# Altium PCB Control Board-v1.0.PcbDoc (part 7 of 8)
Units mil, origin at the board's own origin, x right, y up, seen from the top; angles counter-clockwise.
Board outline 7874.02 x 5118.11 mil, 4 copper layers (Top Layer, Layer 1, Layer 2, Bottom Layer), stack 61.654 mil thick; 475 components, 366 nets, 1579 pads, 587 vias.
Unrouted connection lines stored in the file: 427.
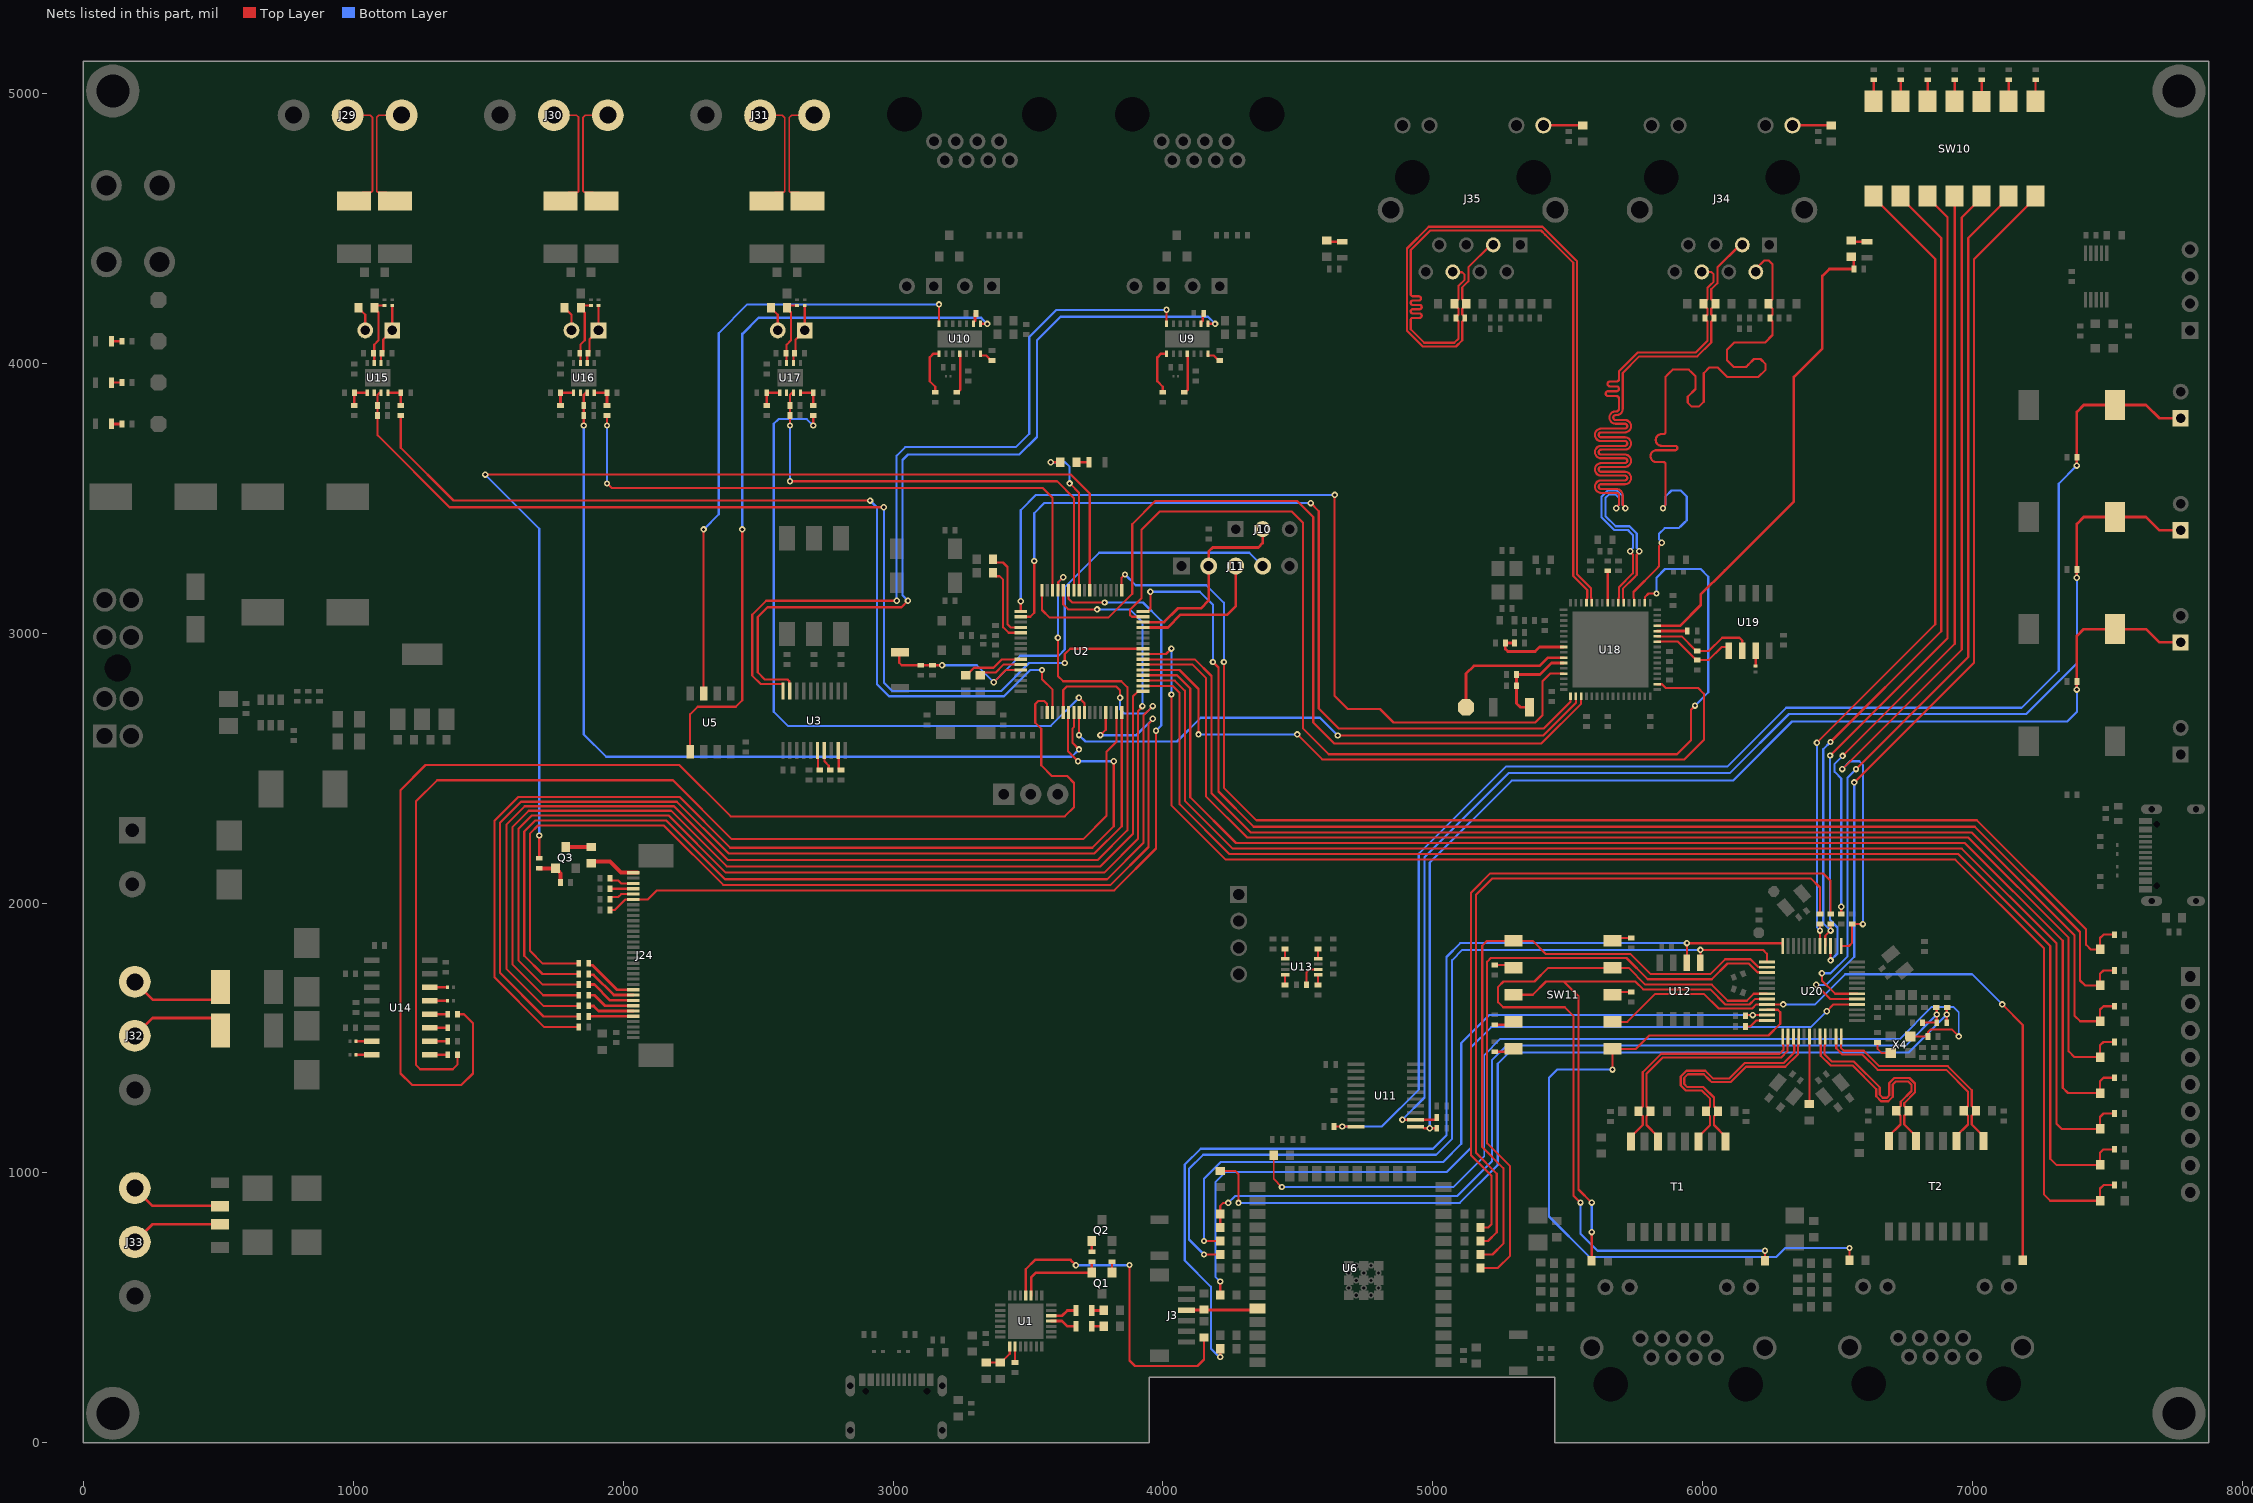
[diagram p6: the nets of this part, all layers, seen from the top]

## Via types
v1: diameter 23.62, hole 11.81, Top Layer to Bottom Layer, 587 vias

## Nets (pads, with @x,y where several pads share a name; then routed paths per layer and width w, separated by ;. In a path a pad name is that pad's centre, name@x,y a point inside that pad or via, vN(x,y) a via of type N, cw(c..) or ccw(c..) an arc to the next point about the centre after c; other vN are vias at no path point) (continued)
NetJ24_5: J24.5 R66.2 | length 165.3
  Top Layer w10: R66.2@1872.47,1579.8 1873.1,1580.43 J24.5@2037.47,1580.43
NetJ24_6: J24.6 R67.2 | length 172.9
  Top Layer w10: R67.2@1872.47,1619.17 1873.37,1618.28 1890.62,1618.28 1908.78,1600.11 J24.6@2037.47,1600.11
NetJ24_7: J24.7 R68.2 | length 181
  Top Layer w10: R68.2@1872.47,1658.54 1893.08,1658.54 1931.82,1619.8 J24.7@2037.47,1619.8
NetJ24_8: J24.8 R69.2 | length 189.2
  Top Layer w10: R69.2@1872.47,1697.91 1893.31,1697.91 1951.74,1639.48 J24.8@2037.47,1639.48
NetJ24_9: J24.9 R70.2 | length 197.4
  Top Layer w10: R70.2@1872.47,1737.28 1875.59,1734.17 1890.62,1734.17 1965.62,1659.17 J24.9@2037.47,1659.17
NetJ24_10: J24.10 R71.2 | length 207.6
  Top Layer w10: R71.2@1872.47,1776.65 1872.47,1773.15 1876.47,1769.15 1887.35,1769.15 1977.65,1678.85 J24.10@2037.47,1678.85
NetJ24_28: J24.28 R93.2 | length 96.1
  Top Layer w8: R93.2@1951.47,2013.87 1951.47,2017.37 1956.47,2022.37 1981.76,2022.37 1992.57,2033.18 J24.28@2037.47,2033.18
NetJ24_29: J24.29 R94.2 | length 86
  Top Layer w8: R94.2@1951.47,2052.87 J24.29@2037.47,2052.87
NetJ24_30: J24.30 R95.2 | length 96.1
  Top Layer w8: R95.2@1951.47,2091.87 1951.47,2088.37 1956.47,2083.37 1981.76,2083.37 1992.57,2072.55 J24.30@2037.47,2072.55
NetJ24_32: J24.32 R97.2 | length 192.2
  Top Layer w15: R97.2@1881.07,2147.55 1888.12,2154.6 1950.59,2154.6 1992.25,2112.94 J24.32@2053.07,2112.94
NetJ26_1: J26.1 R112.1 R116.2 U15.6 | length 228.4
  Top Layer w8: U15.6@1103.32,4000.65 R116.2@1103.32,4036.74 ; R116.2@1106.36,4036.74 1111.04,4041.42 1111.04,4087.96 J26.1@1144.72,4121.65 R112.1@1144.72,4213.2
NetJ26_2: J26.2 R119.2 | length 93.8
  Top Layer w8: R119.2@1019.32,4204.88 1044.72,4179.48 J26.2@1044.72,4121.65
NetJ27_1: J27.1 R136.1 R140.2 U16.6 | length 228.4
  Top Layer w8: U16.6@1867.32,4000.65 R140.2@1867.32,4036.74 ; R140.2@1870.36,4036.74 1875.04,4041.42 1875.04,4087.96 J27.1@1908.72,4121.65 R136.1@1908.72,4213.2
NetJ27_2: J27.2 R142.2 | length 93.8
  Top Layer w8: R142.2@1783.32,4204.88 1808.72,4179.48 J27.2@1808.72,4121.65
NetJ28_1: J28.1 R137.1 R141.2 U17.6 | length 228.4
  Top Layer w8: U17.6@2631.32,4000.65 R141.2@2631.32,4036.74 ; R141.2@2634.36,4036.74 2639.04,4041.42 2639.04,4087.96 J28.1@2672.72,4121.65 R137.1@2672.72,4213.2
NetJ28_2: J28.2 R143.2 | length 93.8
  Top Layer w8: R143.2@2547.32,4204.88 2572.72,4179.48 J28.2@2572.72,4121.65
NetJ34_9: J34.9 R150.2 | length 144.3
  Top Layer w10: J34.9@6331.97,4881.1 R150.2@6476.32,4881.1
NetJ35_9: J35.9 R160.2 | length 146.2
  Top Layer w10: J35.9@5409.15,4881.1 R160.2@5555.32,4881.1
NetLED1_1: LED1.1 R44.2 | length 38.9
  Top Layer w10: LED1.1@104.37,3775.02 R44.2@143.31,3775.02
NetLED2_1: LED2.1 R45.2 | length 38.9
  Top Layer w8: LED2.1@104.37,3928.02 R45.2@143.31,3928.02
NetLED3_1: LED3.1 R46.2 | length 38.9
  Top Layer w8: LED3.1@104.37,4081.02 R46.2@143.31,4081.02
NetLED4_2: LED4.2 R163.1 | length 60.2
  Top Layer w10: R163.1@6549.83,4454.17 6554.3,4449.7 LED4.2@6608.15,4449.7
NetLED5_2: LED5.2 R164.1 | length 60.2
  Top Layer w10: R164.1@4606.32,4454.17 4610.79,4449.7 LED5.2@4664.63,4449.7
NetLED6_1: LED6.1 R89.2 | length 46.6
  Top Layer w8: R89.2@3679.43,3633.11 LED6.1@3726,3633.11
NetLED7_1: LED7.1 R73.1 | length 43.9
  Top Layer w10: LED7.1@3736.54,490.74 R73.1@3780.49,490.74
NetLED7_2: LED7.2 U1.19 | length 99.7
  Top Layer w10: U1.19@3585.98,471.06 3625.87,471.06 3645.55,490.74 LED7.2@3677.49,490.74
NetLED8_1: LED8.1 R75.1 | length 43.9
  Top Layer w10: LED8.1@3736.54,431.69 R75.1@3780.49,431.69
NetLED8_2: LED8.2 U1.18 | length 99.7
  Top Layer w10: U1.18@3585.98,451.37 3625.87,451.37 3645.55,431.69 LED8.2@3677.49,431.69
NetQ1_1: Q1.1 R76.2 | length 40.4
  Top Layer w9: R76.2@3811,671.3 3811,631.44 Q1.1@3811.4,631.04
NetQ2_1: Q2.1 R77.2 | length 40
  Top Layer w9: R77.2@3736.6,708.3 Q2.1@3736.6,748.3
NetQ3_1: Q3.1 R101.2 R102.1 | length 121.9
  Top Layer w15: R101.2@1689.07,2128.81 Q3.1@1749.67,2128.81 1749.67,2126.85 1758.31,2118.2 1759.79,2118.2 1768.57,2109.42 R102.1@1768.57,2076.2
NetQ3_3: Q3.3 R97.1 | length 94
  Top Layer w15: Q3.3@1787.07,2207.55 R97.1@1881.07,2207.55
NetR8_2: R8.2 U1.9 | length 59.5
  Top Layer w8: R8.2@3452.12,297.37 U1.9@3452.12,356.88
NetR34_1: R34.1 U3.6 | length 76.5
  Top Layer w8: U3.6@2720.15,2564.7 2721.69,2563.16 2721.69,2497.68 2726.69,2492.68 R34.1@2728.44,2492.68
NetR35_1: R35.1 U3.7 | length 81.5
  Top Layer w8: U3.7@2745.74,2564.7 2745.74,2525.18 2761.92,2508.99 2761.92,2497.68 2766.92,2492.68 R35.1@2767.63,2492.68
NetR36_1: R36.1 U3.9 | length 78.1
  Top Layer w8: U3.9@2796.92,2564.7 2799.08,2562.54 2799.08,2497.68 2804.08,2492.68 R36.1@2807.22,2492.68
NetR47_2: R47.2 U9.9 | length 40.4
  Top Layer w10: U9.9@4140.98,4145.65 4140.98,4151.55 4146.81,4157.37 R47.2@4146.81,4183.65
NetR49_1: R49.1 U9.4 | length 302
  Top Layer w9: R49.1@4082.31,3892.15 R49.1@4091.19,3901.03 ; R49.1@4082.31,3892.15 R49.1@4078.81,3892.15 R49.1@4082.31,3892.15 ; R49.1@4082.31,3892.15 R49.1@4091.19,3901.03 ; R49.1@4091.19,3901.03 U9.4@4091.19,4034.02 ; R49.1@4091.19,3901.03 U9.4@4091.19,4034.02 ; U9.4@4091.19,4034.02 U9.4@4089.8,4035.41 U9.4@4091.19,4034.02
NetR50_1: R50.1 U9.1 | length 177.7
  Top Layer w9: R50.1@3999.34,3892.15 3999.34,3912.67 3979.01,3933 3979.01,4021.71 3992.71,4035.41 U9.1@4013.03,4035.41
NetR51_2: R51.2 U9.7 | length 57
  Top Layer w9: U9.7@4166.57,4035.41 4166.57,4029.87 4167.98,4028.46 4188.11,4028.46 4206.35,4010.22 R51.2@4209.85,4010.22
NetR55_2: R55.2 U10.9 | length 40.4
  Top Layer w10: U10.9@3297.91,4145.65 3297.91,4151.55 3303.73,4157.37 R55.2@3303.73,4183.65
NetR57_1: R57.1 U10.4 | length 302
  Top Layer w9: R57.1@3239.23,3892.15 R57.1@3235.73,3892.15 R57.1@3239.23,3892.15 ; R57.1@3239.23,3892.15 R57.1@3248.12,3901.03 ; R57.1@3239.23,3892.15 R57.1@3248.12,3901.03 ; R57.1@3248.12,3901.03 U10.4@3248.12,4034.02 ; R57.1@3248.12,3901.03 U10.4@3248.12,4034.02 ; U10.4@3248.12,4034.02 U10.4@3246.73,4035.41 U10.4@3248.12,4034.02
NetR58_1: R58.1 U10.1 | length 177.7
  Top Layer w9: R58.1@3156.27,3892.15 3156.27,3912.67 3135.94,3933 3135.94,4021.71 3149.64,4035.41 U10.1@3169.96,4035.41
NetR59_2: R59.2 U10.7 | length 57
  Top Layer w9: U10.7@3323.5,4035.41 3323.5,4029.87 3324.91,4028.46 3345.03,4028.46 3363.27,4010.22 R59.2@3366.77,4010.22
NetR72_2: R72.2 R74.2 U1.8 | length 126.7
  Top Layer w8: R72.2@3345.99,297.37 R74.2@3397,297.37 3399.5,297.37 3432.43,330.3 U1.8@3432.43,356.88
NetR89_1: R89.1 U2.57 | length 584.3
  Top Layer w8: v1(3584.1,3633.11) R89.1@3619.43,3633.11 ; v1(3654.1,3554.74) 3689.43,3519.4 U2.57@3689.43,3158.79
  Bottom Layer w8: v1(3584.1,3633.11) 3637,3633.11 3654.1,3616.01 v1(3654.1,3554.74)
NetR91_1: R91.1 U13.6 | length 93.8
  Top Layer w8: R91.1@4531.96,1696.86 4531.96,1744.02 4541.96,1754.02 U13.6@4574.48,1754.02
NetR96_1: R96.1 U13.5 | length 37.5
  Top Layer w8: R96.1@4574.48,1696.86 U13.5@4574.48,1734.33
NetR98_1: R98.1 U13.4 | length 37.5
  Top Layer w8: R98.1@4452.43,1696.86 U13.4@4452.43,1734.33
NetR99_2: R99.2 U13.8 | length 36.5
  Top Layer w8: U13.8@4574.48,1793.39 R99.2@4574.48,1829.86
NetR100_2: R100.2 U13.1 | length 36.5
  Top Layer w8: U13.1@4452.43,1793.39 R100.2@4452.43,1829.86
NetR103_1: R103.1 R108.2 U15.1 | length 94.7
  Top Layer w10: R108.2@1004.2,3843.65 R103.1@1004.2,3890.41 U15.1@1052.12,3890.41
NetR106_1: R106.1 R115.2 U15.4 | length 94.2
  Top Layer w10: U15.4@1128.92,3890.41 R106.1@1176.32,3890.41 R115.2@1176.32,3843.65
NetR107_1: R107.1 R110.1 R119.1 U15.7 | length 257.9
  Top Layer w8: U15.7@1077.72,4000.65 1077.72,4036.74 1077.72,4068.8 1093.98,4085.07 1093.98,4187.72 1079.32,4202.38 R119.1@1079.32,4204.88 1087.63,4213.2 R110.1@1116.72,4213.2
NetR109_1: R109.1 U14.12 | length 66.7
  Top Layer w10: U14.12@1283.27,1587.99 R109.1@1350,1587.99
NetR111_1: R111.1 U14.11 | length 66.7
  Top Layer w10: U14.11@1283.27,1537.99 R111.1@1350,1537.99
NetR113_2: R113.2 U14.7 | length 58.7
  Top Layer w10: R113.2@1010,1487.99 U14.7@1068.73,1487.99
NetR114_1: R114.1 U14.10 | length 66.7
  Top Layer w10: U14.10@1283.27,1487.99 R114.1@1350,1487.99
NetR117_2: R117.2 U14.8 | length 58.7
  Top Layer w10: R117.2@1010,1437.99 U14.8@1068.73,1437.99
NetR118_1: R118.1 U14.9 | length 66.7
  Top Layer w10: U14.9@1283.27,1437.99 R118.1@1350,1437.99
NetR120_2: R120.2 U14.13 | length 66.7
  Top Layer w10: U14.13@1283.27,1637.99 R120.2@1350,1637.99
NetR121_2: R121.2 U14.14 | length 66.7
  Top Layer w10: U14.14@1283.27,1687.99 R121.2@1350,1687.99
NetR122_1: R122.1 R132.2 U16.1 | length 94.7
  Top Layer w10: R132.2@1768.2,3843.65 R122.1@1768.2,3890.41 U16.1@1816.12,3890.41
NetR125_1: R125.1 R138.2 U16.4 | length 94.2
  Top Layer w10: U16.4@1892.92,3890.41 R125.1@1940.32,3890.41 R138.2@1940.32,3843.65
NetR126_1: R126.1 R133.2 U17.1 | length 94.7
  Top Layer w10: R133.2@2532.2,3843.65 R126.1@2532.2,3890.41 U17.1@2580.12,3890.41
NetR129_1: R129.1 R139.2 U17.4 | length 94.2
  Top Layer w10: U17.4@2656.92,3890.41 R129.1@2704.32,3890.41 R139.2@2704.32,3843.65
NetR130_1: R130.1 R134.1 R142.1 U16.7 | length 257.9
  Top Layer w8: U16.7@1841.72,4000.65 1841.72,4036.74 1841.72,4068.8 1857.98,4085.07 1857.98,4187.72 1843.32,4202.38 R142.1@1843.32,4204.88 1851.63,4213.2 R134.1@1880.72,4213.2
NetR131_1: R131.1 R135.1 R143.1 U17.7 | length 257.9
  Top Layer w8: U17.7@2605.72,4000.65 2605.72,4036.74 2605.72,4068.8 2621.98,4085.07 2621.98,4187.72 2607.32,4202.38 R143.1@2607.32,4204.88 2615.63,4213.2 R135.1@2644.72,4213.2
NetR156_2: R156.2 U18.57 | length 119
  Top Layer w10: U18.57@5647.43,3111.83 R156.2@5647.43,3230.83
NetR157_2: R157.2 U18.44 | length 111.8
  Top Layer w10: U18.44@5830.5,3007.5 R157.2@5942.3,3007.5
NetR158_2: R158.2 R159.2 U18.8 | length 282.4
  Top Layer w10: R158.2@5302.3,2963.21 R159.2@5268.3,2963.21 5268.3,2941.22 5277.56,2931.96 5378.97,2931.96 5395.45,2948.44 U18.8@5484.05,2948.44
NetR169_1: R169.1 U19.7 | length 56.7
  Top Layer w10: R169.1@6195.8,2877.83 U19.7@6195.8,2934.53
NetR193_2: R193.2 U20.48 | length 89.1
  Top Layer w8: R193.2@6157.41,1543 6176.24,1543 6198.65,1565.42 U20.48@6237.19,1565.42
NetR195_1: R195.1 U20.6 | length 251.5
  Top Layer w8: R195.1@6394.67,1254.89 U20.6@6394.67,1506.37
NetR209_2: R209.2 X4.3 | length 79.3
  Top Layer w7: R209.2@6647.04,1484 6647.04,1459.51 6662.06,1444.49 X4.3@6695.58,1444.49
NetR215_1: R215.1 SW11.10 | length 71.9
  Top Layer w8: SW11.10@5665.14,1860 SW11.10@5670.14,1865 ; SW11.10@5670.14,1870 R215.1@5735,1870
NetR216_1: R216.1 SW11.8 | length 69.9
  Top Layer w8: SW11.8@5665.14,1670 R216.1@5735,1670
NetR217_2: R217.2 SW10.1 | length 80
  Top Layer w8: SW10.1@7233,4970 R217.2@7233,5050
NetR218_2: R218.2 SW10.2 | length 80
  Top Layer w8: SW10.2@7133,4970 R218.2@7133,5050
NetR219_2: R219.2 SW10.3 | length 80
  Top Layer w8: SW10.3@7033,4970 R219.2@7033,5050
NetR220_2: R220.2 SW10.4 | length 80
  Top Layer w8: SW10.4@6933,4970 R220.2@6933,5050
NetR221_2: R221.2 SW10.5 | length 80
  Top Layer w8: SW10.5@6833,4970 R221.2@6833,5050
NetR222_2: R222.2 SW10.6 | length 80
  Top Layer w8: SW10.6@6733,4970 R222.2@6733,5050
NetR223_2: R223.2 SW10.7 | length 80
  Top Layer w8: SW10.7@6633,4970 R223.2@6633,5050
NetR224_2: R224.2 SW11.2 | length 70
  Top Layer w8: R224.2@5229,1771 SW11.2@5299,1771
NetR225_2: R225.2 SW11.4 | length 70
  Top Layer w8: R225.2@5229,1549 SW11.4@5299,1549
NetR226_2: R226.2 SW11.5 | length 70
  Top Layer w8: R226.2@5229,1449 SW11.5@5299,1449
NetTP5_1: TP5.1 U18.10 | length 510.4
  Top Layer w10: TP5.1@5122.8,2725.33 5122.8,2850.09 5151.54,2878.82 5395.42,2878.82 5425.67,2909.07 U18.10@5484.05,2909.07
nFAULT_CAN: U3.19 U9.8 | length 3108.9
  Top Layer w8: U3.19@2617.79,2785.18 2615.49,2787.48 2615.49,2821.54 2608.95,2828.07 2525.23,2828.07 2498.6,2854.7 2498.6,3059.75 2534.87,3096.02 3030.98,3096.02 v1(3055,3120.04)
  Top Layer w9: U9.8@4166.57,4145.65 v1(4193.04,4145.65)
  Bottom Layer w8: v1(3055,3120.04) 3035,3140.04 3035,3641.42 3055.03,3661.44 3467.91,3661.44 3533.32,3726.85 3533.32,4084.97 3620.22,4171.87 4166.81,4171.87 v1(4193.04,4145.65)
nFAULT_CAN_2: U5.5 U10.8 | length 2678.4
  Top Layer w8: U5.5@2248.08,2560.18 2248.08,2699.19 2276,2727.11 2417.56,2727.11 2441.58,2751.13 v1(2441.58,3384.11)
  Top Layer w9: U10.8@3323.5,4145.65 v1(3348.96,4145.65)
  Bottom Layer w9: v1(2441.58,3384.11) 2441.58,4035.69 2441.58,4108.28 2501.81,4168.52 3326.09,4168.52 v1(3348.96,4145.65)
NRST: C13.2 J11.4 R20.1 SW6.2 U2.12 | length 1888.6
  Top Layer w8: SW6.2@3022.96,2929.27 3022.96,2889.84 3031.96,2880.84 R20.1@3145.96,2880.84 v1(3181.71,2880.84) ; v1(3372.84,2818.31) 3418.05,2863.52 U2.12@3472.9,2863.52
  Bottom Layer w8: v1(3181.71,2880.84) 3310.31,2880.84 v1(3372.84,2818.31) 3470.7,2916.16 3613.33,2916.16 3636.28,2939.11 3636.28,3170.39 3763.61,3297.72 4319.98,3297.72 J11.4@4369.27,3248.42
nSTB_CAN: U3.20 U9.14 | length 2956.7
  Top Layer w8: U3.20@2592.19,2785.18 2592.19,2809.65 2589.9,2811.95 2508.88,2811.95 2478.33,2842.5 2478.33,3068.15 2530.23,3120.04 v1(3013.37,3120.04) ; U9.14@4013.03,4145.65 v1(4013.03,4197.65)
  Bottom Layer w8: v1(3013.37,3120.04) 3013.37,3657.48 3045,3689.11 3455,3689.11 3504.62,3738.73 3504.62,4096.85 3605.42,4197.65 v1(4013.03,4197.65)
nSTB_CAN_2: U5.3 U10.14 | length 2290.2
  Top Layer w8: U5.3@2298.08,2776.72 v1(2298.08,3384.11) ; U10.14@3169.96,4145.65 v1(3169.96,4217.86)
  Bottom Layer w8: v1(2298.08,3384.11) 2353.98,3440.01 2353.98,4111.5 2460.33,4217.86 v1(3169.96,4217.86)
OSC_EN: R172.1 R213.2 X4.1 | length 3439.8
  Top Layer w7: R172.1@4410.5,1065 4410.5,977.9 v1(4440.5,947.9) ; X4.1@6768.41,1505.51 R213.2@6833.6,1505.51 6833.96,1505.87 6833.96,1521 6844.69,1531.74 6922.26,1531.74 v1(6948,1506)
  Bottom Layer w7: v1(4440.5,947.9) 5075.25,947.9 5190.09,1062.73 5190.09,1436.83 5250.24,1496.98 6730.72,1496.98 6848.74,1615 6928,1615 6948,1595 v1(6948,1506)
P1LED0: R177.2 SW11.3 U20.44 | length 2079.5
  Top Layer w8: SW11.3@5299,1660 5369.91,1660 5419.2,1709.29 5484.56,1709.29 ; R177.2@5588.21,674.96 v1(5588.21,781) ; v1(5588.21,890.08) 5539.47,938.82 5539.47,1654.38 5484.56,1709.29 ; U20.44@6237.19,1644.16 6237.03,1644 6192.64,1644 6172.75,1624.11 6083.47,1624.11 6027.29,1680.3 5779.08,1680.3 5750.09,1709.29 5484.56,1709.29
  Bottom Layer w8: v1(5588.21,781) v1(5588.21,890.08)
P1LED1: R181.2 SW11.9 U20.43 | length 3009.7
  Top Layer w8: v1(5546.64,890.08) 5520.35,916.38 5520.35,1582.34 5488.69,1614 5260,1614 5241.5,1632.5 5241.5,1689.5 5261.29,1709.29 5376.29,1709.29 5427,1760 SW11.9@5665.14,1760 5725.03,1760 5787.13,1697.9 6032.92,1697.9 6092.54,1638.28 6163.17,1638.28 6188.74,1663.85 U20.43@6237.18,1663.85 ; R181.2@6230.37,674.96 v1(6230.37,712) 6230.37,713.37 v1@6231,714
  Bottom Layer w8: v1(5546.64,890.08) 5546.64,775.36 5610,712 v1(6230.37,712)
P2LED0: R192.2 SW11.6 U20.46 | length 2829.8
  Top Layer w8: SW11.6@5665.14,1460 SW11.6@5665.47,1459.67 ; v1(5665.47,1382.97) SW11.6@5665.47,1459.67 ; U20.46@6237.19,1604.79 6277.32,1604.79 6286.67,1595.43 6286.67,1552.87 6242.92,1509.12 5801.95,1509.12 5752.51,1459.67 SW11.6@5665.47,1459.67 ; R192.2@6543.16,677 v1(6543.16,722.13)
  Bottom Layer w8: v1(5665.47,1382.97) 5459.97,1382.97 5429.93,1352.93 5429.93,838.83 5580.57,688.19 6271.19,688.19 6305.13,722.13 v1(6543.16,722.13)
P2LED1: R198.2 SW11.7 U20.45 | length 2587.4
  Top Layer w8: SW11.7@5665.14,1560 5665.47,1559.67 5719.7,1559.67 5823.69,1663.66 6003.94,1663.66 6058.49,1609.12 6182.91,1609.12 6198.27,1624.48 U20.45@6237.18,1624.48 v1(6297.55,1624.48) ; v1(7109,1624.48) 7185.16,1548.32 R198.2@7185.16,677
  Bottom Layer w8: v1(6297.55,1624.48) 6415.85,1624.48 6527.37,1736 6997.48,1736 v1(7109,1624.48)
PA8: D10.1 R28.1 U2.36 | length 4844.6
  Top Layer w8: U2.36@3925.65,2843.84 4052,2843.84 4100.8,2795.04 4100.8,2391.9 4270.25,2222.45 6970.75,2222.45 7333.05,1860.16 7333.05,1315.71 7352.67,1296.09 D10.1@7471.63,1296.09 ; D10.1@7471.63,1296.52 7471.63,1340.21 7484.13,1352.71 R28.1@7525.18,1352.71
PAUSE: C30.2 J5.1 R7.1 SW4.1 U11.12 | length 4789.7
  Top Layer w8: v1(4886.79,1197.33) U11.12@4935.47,1197.33 5013,1197.33 5018,1202.33 R7.1@5018,1205.77
  Top Layer w10: v1(7385.5,3205.45) C30.2@7385.5,3236.11 7385.5,3404.38 7411.22,3430.09 SW4.1@7526.45,3430.09 7641.79,3430.09 7691,3380.88 J5.1@7770.22,3380.88
  Bottom Layer w8: v1(4886.79,1197.33) 4968.99,1279.53 4968.99,2169.99 5280.24,2481.24 6100.11,2481.24 6319.43,2700.55 7198.38,2700.55 7385.5,2887.68 v1(7385.5,3205.45)
PB14: D8.1 R30.1 U2.34 | length 5086.6
  Top Layer w8: U2.34@3925.65,2804.47 4035.48,2804.47 4061.59,2778.36 4061.59,2365.96 4245.82,2181.73 6946.32,2181.73 7286.98,1841.08 7286.98,1052.95 7309.83,1030.09 D8.1@7471.63,1030.09 ; D8.1@7471.63,1031.38 7471.63,1075.07 7484.13,1087.57 R30.1@7525.18,1087.57
PB15: D9.1 R29.1 U2.35 | length 4984.3
  Top Layer w8: U2.35@3925.65,2824.15 4043.76,2824.15 4081.05,2786.86 4081.05,2379.13 4258.57,2201.61 6959.07,2201.61 7310.05,1850.63 7310.05,1182.18 7329.13,1163.09 D9.1@7471.63,1163.09 D9.1@7471.63,1164.8 ; D9.1@7459.88,1176.55 D9.1@7471.63,1164.8 ; R29.1@7525.18,1220.14 7484.13,1220.14 7471.63,1207.64 D9.1@7471.63,1164.8
PC6: D11.1 R27.1 U2.38 | length 4753.7
  Top Layer w8: U2.38@3925.65,2883.21 4109.92,2883.21 4158.94,2834.19 4158.94,2395.68 4311.81,2242.8 6983.56,2242.8 7354.97,1871.39 7354.97,1451.24 7377.12,1429.09 D11.1@7471.63,1429.09 7471.63,1472.78 7484.13,1485.28 R27.1@7525.18,1485.28
PC7: D12.1 R26.1 U2.39 | length 4632.6
  Top Layer w8: U2.39@3925.65,2902.89 4118.1,2902.89 4179.61,2841.38 4179.61,2406.84 4324.97,2261.48 6996.76,2261.48 7377.06,1881.18 7377.06,1582.94 7397.91,1562.09 D12.1@7471.63,1562.09 7471.63,1605.35 7484.13,1617.85 R26.1@7525.18,1617.85
PC8: D13.1 R24.1 U2.48 | length 4817.7
  Top Layer w8: U2.48@3925.65,3080.06 3927.55,3081.96 3945.85,3081.96 3953.3,3089.41 v1(3953.3,3153.27) ; v1(4185,2893.2) 4205.43,2872.78 4205.43,2413.37 4336.03,2282.76 7007.6,2282.76 7397.49,1892.88 7397.49,1713.14 7415.54,1695.09 D13.1@7471.63,1695.09 7471.63,1737.93 7484.13,1750.43 R24.1@7525.18,1750.43
  Bottom Layer w8: v1(3953.3,3153.27) 4136.62,3153.27 4185,3104.89 v1(4185,2893.2)
PC9: D14.1 R23.1 U2.49 | length 4787
  Top Layer w8: U2.49@3846.91,3158.79 3846.91,3204.84 3859.14,3217.06 v1(3859.14,3217.34) ; v1(4225.52,2893.2) 4225.52,2427.21 4345.97,2306.76 7014.84,2306.76 7419.86,1901.75 7419.86,1845.61 7437.38,1828.09 D14.1@7471.63,1828.09 7471.63,1870.5 7484.13,1883 R23.1@7525.18,1883
  Bottom Layer w8: v1(3859.14,3217.34) 3899.19,3177.29 4160.74,3177.29 4225.52,3112.51 v1(4225.52,2893.2)
PC14-OSC32_IN: R13.2 U2.4 | length 332.6
  Top Layer w8: R13.2@3370.27,3274.42 3370.27,3272.94 3381.27,3261.94 3407.54,3261.94 3424.27,3245.21 3424.27,3033.25 3436.53,3021 U2.4@3472.9,3021
PC15-OSC32_OUT: R14.2 U2.5 | length 298.5
  Top Layer w8: R14.2@3370.27,3223.42 3370.27,3221.55 3381.27,3210.55 3394.73,3210.55 3407.91,3197.36 3407.91,3021.9 3428.49,3001.32 U2.5@3472.9,3001.32
PD8: D7.1 R31.1 U2.40 | length 5378.1
  Top Layer w8: U2.40@3925.65,2922.58 4011.06,2922.58 v1(4031.06,2942.58) ; v1(4031.06,2772.42) 4031.06,2362.17 4232.25,2160.98 6935.13,2160.98 7264.39,1831.72 7264.39,919.87 7287.17,897.09 D7.1@7471.63,897.09 ; D7.1@7471.63,898.8 7471.63,942.5 7484.13,955 R31.1@7525.18,955
  Bottom Layer w8: v1(4031.06,2772.42) v1(4031.06,2942.58)
PF0-OSC_IN: R18.2 U2.10 | length 227.9
  Top Layer w8: R18.2@3269.46,2843.84 3271.96,2843.84 3299.56,2871.44 3371.99,2871.44 3403.44,2902.89 U2.10@3472.9,2902.89
PF1-OSC_OUT: R19.2 U2.11 | length 166.7
  Top Layer w8: R19.2@3322.46,2843.84 3332.99,2854.36 3379.95,2854.36 3408.8,2883.21 U2.11@3472.9,2883.21
RE/DE/RS485/T: R104.1 R105.1 U2.41 U15.2 U15.3 | length 3859
  Top Layer w8: U15.3@1103.32,3890.41 1097.63,3890.41 1090.32,3883.09 R104.1@1090.32,3843.65 R105.1@1090.32,3806.57 1090.32,3733.07 1357.03,3466.37 v1(2965.82,3466.37) ; v1(3636.28,2889.11) 3636.28,2922.58 3655.96,2942.26 U2.41@3925.65,2942.26
  Bottom Layer w8: v1(2965.82,3466.37) 2965.82,2817.32 2998.04,2785.09 3399.72,2785.09 3503.74,2889.11 v1(3636.28,2889.11)
RE/DE/RS485/T-2: R123.1 R124.1 U2.23 U16.2 U16.3 | length 3303.5
  Top Layer w8: v1(1854.32,3769.11) R124.1@1854.32,3806.57 R123.1@1854.32,3843.65 1854.32,3883.09 1861.63,3890.41 U16.3@1867.32,3890.41 ; U2.23@3669.74,2706.04 3669.74,2651.6 3665.21,2647.07 3665.21,2592.92 v1(3689.02,2569.11)
  Bottom Layer w8: v1(1854.32,3769.11) 1854.32,2624.67 1937.28,2541.71 3661.62,2541.71 v1(3689.02,2569.11)
RE/DE/RS485/T-3: R127.1 R128.1 U2.58 U17.2 U17.3 | length 1755.5
  Top Layer w8: v1(2618.32,3562.34) 3607.79,3562.34 3669.74,3500.39 U2.58@3669.74,3158.79 ; v1(2618.32,3769.11) R128.1@2618.32,3806.57 R127.1@2618.32,3843.65 2618.32,3883.09 2625.63,3890.41 U17.3@2631.32,3890.41
  Bottom Layer w8: v1(2618.32,3562.34) v1(2618.32,3769.11)
REF_CLK_50M_I: R78.1 R229.1 R230.2 | length 3369.2
  Top Layer w8: R78.1@4212,1007.9 4267.43,1007.9 4279.73,995.59 v1(4279.73,889.21) ; R229.1@6903.74,1557 v1(6903.74,1587.14) 6903.74,1611.28 R230.2@6905.74,1613.28
  Bottom Layer w8: v1(4279.73,889.21) 5099.94,889.21 5240.3,1029.57 5240.3,1404.84 5282.32,1446.86 6763.46,1446.86 v1(6903.74,1587.14)
REF_CLK_50M_O: R79.1 R80.1 R227.2 R228.2 R229.2 | length 3361.6
  Top Layer w8: R79.1@4212,798 R80.1@4212,848 4212,878.06 4223.15,889.21 v1(4241.71,889.21) v1@4244.71,889.21 ; R227.2@6813.63,1557 R229.2@6866.74,1557 v1(6866.74,1587.14) 6866.74,1611.28 R228.2@6864.74,1613.28
  Bottom Layer w8: v1(4241.71,889.21) 4267.34,914.84 5090.57,914.84 5218.3,1042.57 5218.3,1417.84 5272.32,1471.86 6751.46,1471.86 v1(6866.74,1587.14)
RS232_RX: F3.1 J32.1 | length 343.1
  Top Layer w10: J32.1@191,1708.11 257,1642.11 505.73,1642.11 F3.1@506.43,1641.41
RS232_RX-2: F6.1 J33.1 | length 343.1
  Top Layer w10: J33.1@191,944.11 257,878.11 505.73,878.11 F6.1@506.43,877.41
RS232_TX: F4.1 J32.2 | length 343
  Top Layer w10: J32.2@191,1508.11 257,1574.11 505.81,1574.11 F4.1@506.43,1574.73
RS232_TX-2: F5.1 J33.2 | length 343
  Top Layer w10: J33.2@191,744.11 257,810.11 505.81,810.11 F5.1@506.43,810.73
RS485-2_N: F7.2 J30.2 | length 451
  Top Layer w6.5: J30.2@1743.32,4918.65 1827.22,4918.65 1835.07,4910.79 1835.07,4637.24 1831.26,4633.43 1799.11,4633.43 F7.2@1767.32,4601.65
RS485-2_P: F9.2 J30.1 | length 451.2
  Top Layer w6.5: F9.2@1919.32,4601.65 1887.53,4633.43 1855.38,4633.43 1851.57,4637.24 1851.57,4911.04 1859.17,4918.65 J30.1@1943.32,4918.65
RS485-3_N: F8.2 J31.2 | length 450.3
  Top Layer w6.5: J31.2@2507.32,4918.65 2589.91,4918.65 2599.07,4909.49 2599.07,4637.24 2595.26,4633.43 2563.11,4633.43 F8.2@2531.32,4601.65
RS485-3_P: F10.2 J31.1 | length 450.6
  Top Layer w6.5: F10.2@2683.32,4601.65 2651.53,4633.43 2619.38,4633.43 2615.57,4637.24 2615.57,4910.04 2624.17,4918.65 J31.1@2707.32,4918.65
RS485_N: F1.2 J29.2 | length 451
  Top Layer w6.5: J29.2@979.32,4918.65 1063.22,4918.65 1071.07,4910.79 1071.07,4637.24 1067.26,4633.43 1035.11,4633.43 F1.2@1003.32,4601.65
RS485_P: F2.2 J29.1 | length 451.2
  Top Layer w6.5: F2.2@1155.32,4601.65 1123.53,4633.43 1091.38,4633.43 1087.57,4637.24 1087.57,4911.04 1095.17,4918.65 J29.1@1179.32,4918.65
RST#: C59.2 R144.2 SW8.2 U18.11 | length 353.5
  Top Layer w10: SW8.2@5357.73,2725.33 5323.83,2725.33 5309.3,2739.86 C59.2@5309.3,2805.33 R144.2@5309.3,2846.33 5396.11,2846.33 5439.17,2889.39 U18.11@5484.05,2889.39
RSTN: R171.1 R191.2 U20.47 | length 2874.7
  Top Layer w8: v1(4152,748) R171.1@4212,748 ; R191.2@6157.41,1582.11 6160.41,1585.11 U20.47@6237.18,1585.11
  Bottom Layer w8: v1(4152,748) 4152,978.72 4214.03,1040.74 5037.74,1040.74 5105,1108 5105,1481.65 5208.35,1585 v1(6185,1585)
RTS: Q1.2 R77.1 U1.24 | length 339.8
  Top Layer w9: U1.24@3511.17,545.86 3511.17,612.17 3530.04,631.04 Q1.2@3736.6,631.04 R77.1@3736.6,671.3
RUNLED: R163.2 R165.1 U18.45 | length 1776
  Top Layer w10: U18.45@5830.5,3027.18 5915.72,3027.18 5991.8,3103.26 5991.8,3142.88 6081.51,3232.59 6081.69,3232.59 6337.12,3488.03 6337.12,3949.02 6442.67,4054.56 6442.67,4322.93 6468.6,4348.86 R165.1@6559.33,4348.86 6559.33,4384.67 R163.2@6549.83,4394.17
RX1_N: R186.2 T1.8 U20.1 | length 894.5
  Top Layer w8: T1.8@5734.08,1116.83 5734.08,1134.74 5777.08,1177.74 5777.08,1210.04 5761.56,1225.55 R186.2@5761.56,1228.05 5761.56,1230.55 5777.08,1246.07 5777.08,1372.88 5845.88,1441.68 6284.48,1441.68 6299.08,1456.28 6299.08,1471.4 6297.55,1472.93 6297.55,1505.05 U20.1@6296.23,1506.37
RX1_P: R185.2 T1.6 U20.2 | length 894.5
  Top Layer w8: T1.6@5834.08,1116.83 5834.08,1134.74 5791.08,1177.74 5791.08,1210.04 5806.6,1225.55 R185.2@5806.6,1228.05 5806.6,1230.55 5791.08,1246.07 5791.08,1367.08 5851.68,1427.68 6290.28,1427.68 6313.08,1450.48 6313.08,1471.4 6314.61,1472.93 6314.61,1505.05 U20.2@6315.93,1506.37
RX2_N: R203.2 T2.8 U20.8 | length 812.1
  Top Layer w8: U20.8@6434.04,1506.37 6435.35,1505.05 6435.35,1472.91 6436.87,1471.39 6436.87,1434.52 6472.87,1398.52 6554.12,1398.52 6642.35,1310.29 6642.35,1283.74 6660.21,1265.87 6687.34,1265.87 6703.58,1282.11 6703.58,1327.7 6714.93,1339.06 6760.39,1339.06 6773.19,1326.26 6773.19,1303.86 6733.16,1263.83 6733.16,1249.11 6716.64,1232.59 R203.2@6716.64,1230.09 6716.64,1227.59 6732.16,1212.08 6732.16,1179.78 6689.16,1136.78 T2.8@6689.16,1118.87
RX2_P: R202.2 T2.6 U20.9 | length 810.6
  Top Layer w8: U20.9@6453.71,1506.37 6452.4,1505.05 6452.4,1472.91 6450.87,1471.39 6450.87,1440.32 6478.67,1412.52 6559.92,1412.52 6655.35,1317.09 6655.35,1290.3 6666.77,1278.87 6681.96,1278.87 6690.58,1287.49 6690.58,1333.09 6709.55,1352.06 6765.77,1352.06 6786.19,1331.65 6786.19,1298.47 6746.16,1258.45 6746.16,1248.11 6761.68,1232.59 6761.68,1227.59 6746.16,1212.08 6746.16,1179.78 6789.16,1136.78 T2.6@6789.16,1118.87
RXA_N: C65.2 J34.6 R145.1 U18.54 | length 2854.4
  Top Layer w8: v1(5679.37,3462.65) 5679.37,3465.35 5689.17,3475.14 5689.17,3499.65 5689.17,3510.65 ccw(c5680.17,3510.65) 5680.17,3519.65 5622.98,3519.65 cw(c5622.98,3542.65) 5622.98,3565.65 5710.93,3565.65 ccw(c5710.93,3574.65) 5710.93,3583.65 5622.98,3583.65 cw(c5622.98,3606.65) 5622.98,3629.65 5710.93,3629.65 ccw(c5710.93,3638.65) 5710.93,3647.65 5622.98,3647.65 cw(c5622.98,3670.65) 5622.98,3693.65 5710.93,3693.65 ccw(c5710.93,3702.65) 5710.93,3711.65 5622.98,3711.65 cw(c5622.98,3734.65) 5622.98,3757.65 5710.93,3757.65 ccw(c5710.93,3766.65) 5710.93,3775.65 5677,3775.65 cw(c5677,3798.65) 5677,3821.65 5680.17,3821.65 ccw(c5680.17,3830.65) 5689.17,3830.65 5689.17,3859.54 5689.17,3865.11 5689.17,3869.11 ccw(c5680.17,3869.11) 5680.17,3878.11 5649.09,3878.11 cw(c5649.09,3887.11) 5649.09,3896.11 5680.17,3896.11 ccw(c5680.17,3905.11) 5680.17,3914.11 5656.06,3914.11 cw(c5656.06,3923.11) 5656.06,3932.11 5680.17,3932.11 ccw(c5680.17,3941.11) 5689.17,3941.11 5689.17,3969.35 5691.39,3971.57 5759.2,4039.38 5767.46,4039.38 5785.52,4039.38 5970.67,4039.4 5974.08,4039.4 6017.33,4082.66 6017.33,4154.63 6007.82,4164.15 C65.2@6007.82,4167.65 6007.82,4171.15 6017.33,4180.66 6017.33,4202.13 6002.32,4217.15 R145.1@6002.32,4219.65 6002.32,4222.15 6017.33,4237.16 6017.33,4279.66 6025.53,4287.86 6039.84,4302.16 6039.84,4329.4 6031.18,4338.06 5996.47,4338.06 J34.6@5996.34,4338.19 ; U18.54@5706.49,3111.83 5705.56,3112.75 5705.56,3128.74 5703.64,3130.66 5703.64,3164.46 5746.7,3207.52 5754.9,3215.72 5754.9,3290.96 5764.71,3300.77 v1(5764.71,3303.46)
  Bottom Layer w8: v1(5679.37,3462.65) 5679.37,3465.33 5689.19,3475.14 5689.19,3500.93 5675.7,3514.41 5653.07,3514.41 5639,3500.35 5639,3433.93 5677.04,3395.9 5728.21,3395.9 5740,3384.11 5754.9,3369.21 5754.9,3315.96 5764.71,3306.14 v1(5764.71,3303.46)
RXA_P: C66.2 J34.3 R146.1 U18.55 | length 2854.4
  Top Layer w8: U18.55@5686.8,3111.83 5687.72,3112.75 5687.72,3128.74 5689.64,3130.66 5689.64,3170.26 5740.9,3221.52 5740.9,3290.96 5731.09,3300.77 v1(5731.09,3303.46) ; v1(5713,3462.65) 5713,3465.32 5703.17,3475.14 5703.17,3499.65 5703.17,3510.65 ccw(c5680.17,3510.65) 5680.17,3533.65 5622.98,3533.65 cw(c5622.98,3542.65) 5622.98,3551.65 5710.93,3551.65 ccw(c5710.93,3574.65) 5710.93,3597.65 5622.98,3597.65 cw(c5622.98,3606.65) 5622.98,3615.65 5710.93,3615.65 ccw(c5710.93,3638.65) 5710.93,3661.65 5622.98,3661.65 cw(c5622.98,3670.65) 5622.98,3679.65 5710.93,3679.65 ccw(c5710.93,3702.65) 5710.93,3725.65 5622.98,3725.65 cw(c5622.98,3734.65) 5622.98,3743.65 5710.93,3743.65 ccw(c5710.93,3766.65) 5710.93,3789.65 5677,3789.65 cw(c5677,3798.65) 5677,3807.65 5680.17,3807.65 ccw(c5680.17,3830.65) 5703.17,3830.65 5703.17,3859.54 5703.17,3963.55 5765,4025.38 5979.85,4025.38 6031.33,4076.86 6031.33,4154.63 6040.84,4164.15 C66.2@6040.84,4167.65 6040.84,4171.15 6031.33,4180.66 6031.33,4202.13 6046.34,4217.15 R146.1@6046.34,4219.65 6046.34,4222.15 6031.33,4237.16 6031.33,4273.86 6053.84,4296.36 6053.84,4354.4 6137.62,4438.19 J34.3@6146.34,4438.19
  Bottom Layer w8: v1(5713,3462.65) 5713,3465.33 5703.19,3475.14 5703.19,3506.73 5681.5,3528.41 5647.27,3528.41 5625,3506.15 5625,3428.14 5671.24,3381.9 5722.42,3381.9 5730.1,3374.21 5740.9,3363.41 5740.9,3315.96 5731.09,3306.14 v1(5731.09,3303.46)
RXB_N: C91.2 J35.6 R151.1 U18.61 | length 2975
  Top Layer w8: J35.6@5073.52,4338.19 5074.51,4337.2 5108.35,4337.2 5117.45,4328.1 5117.45,4309.53 5102.71,4294.79 5094.5,4286.59 5094.5,4237.16 5079.49,4222.15 R151.1@5079.49,4219.65 5079.49,4217.15 5094.5,4202.13 5094.5,4180.66 5084.99,4171.15 C91.2@5084.99,4167.65 5084.99,4164.15 5094.5,4154.63 5094.5,4090.76 5079.49,4075.75 4967.92,4075.75 4917.7,4125.96 4917.7,4140.03 4917.7,4160.03 cw(c4925.7,4160.03) 4925.7,4168.03 4950.48,4168.03 ccw(c4950.48,4176.03) 4950.48,4184.03 4925.7,4184.03 cw(c4925.7,4192.03) 4925.7,4200.03 4950.48,4200.03 ccw(c4950.48,4208.03) 4950.48,4216.03 4925.7,4216.03 cw(c4925.7,4224.03) 4925.7,4232.03 4947.74,4232.03 ccw(c4947.74,4240.03) 4947.74,4248.03 4925.7,4248.03 cw(c4925.7,4256.03) 4917.7,4256.03 4917.7,4295.91 4917.7,4419.3 4990.05,4491.65 5400.37,4491.65 5416.37,4475.65 5520.17,4371.85 5520.17,3211.38 5571.53,3160.02 5571.53,3130.66 5569.61,3128.74 5569.61,3112.75 U18.61@5568.69,3111.83
RXB_P: C92.2 J35.3 R152.1 U18.60 | length 2975
  Top Layer w8: J35.3@5223.52,4438.19 5214.8,4438.19 5131.45,4354.84 5131.45,4303.73 5108.5,4280.79 5108.5,4237.16 5123.52,4222.15 R152.1@5123.52,4219.65 5123.52,4217.15 5108.5,4202.13 5108.5,4180.66 5118.02,4171.15 C92.2@5118.02,4167.65 5118.02,4164.15 5108.5,4154.63 5108.5,4084.96 5085.29,4061.75 4962.12,4061.75 4903.7,4120.16 4903.7,4425.1 4984.25,4505.65 5406.17,4505.65 5530.07,4381.75 5534.17,4377.65 5534.17,3217.18 5585.53,3165.82 5585.53,3130.66 5587.45,3128.74 5587.45,3112.75 U18.60@5588.38,3111.83
RXD0: J3.4 R175.2 U6.34 | length 266
  Top Layer w10: J3.4@4086.23,492.01 4343.79,492.01 U6.34@4349.78,498
RXD/RS232: R118.2 U2.31 | length 4295.7
  Top Layer w8: R118.2@1387,1437.99 1387,1402.91 1368.5,1384.41 1248.11,1384.41 1232,1400.52 1232,2376.29 1310.88,2455.16 2184.6,2455.16 2402.82,2236.94 3704.59,2236.94 3790.85,2323.2 3790.85,2560.18 3827.22,2596.55 U2.31@3827.22,2706.04
RXD/RS232-2: R109.2 U2.18 | length 4797.2
  Top Layer w8: R109.2@1387,1587.99 1410.25,1587.99 1443.78,1554.46 1443.78,1368.78 1401.28,1326.27 1217.5,1326.27 1175,1368.77 1175,2418.41 1267.99,2511.41 2207.73,2511.41 2398.1,2321.04 3636.23,2321.04 3670.34,2355.15 3670.34,2444.99 3644.85,2470.48 3588.23,2470.48 3548.73,2509.99 3548.73,2645.61 3526.75,2667.59 3526.75,2737.43 3538.06,2748.74 3560.21,2748.74 3570.42,2738.54 3570.42,2706.95 U2.18@3571.32,2706.04
RXD/RS485: R115.1 U2.19 | length 3474.5
  Top Layer w8: R115.1@1176.32,3806.65 1176.32,3686.37 1371.69,3491 v1(2914.82,3491) ; v1(3551.63,2863.52) 3551.63,2829.02 3591,2789.65 U2.19@3591,2706.04
  Bottom Layer w8: v1(2914.82,3491) 2940.21,3465.61 2940.21,2810.84 2985,2766.05 3410.89,2766.05 3508.36,2863.52 v1(3551.63,2863.52)
RXD/RS485-2: R138.1 U2.62 | length 2267.2
  Top Layer w8: v1(1940.32,3554.11) 1940.76,3554.11 1957.38,3537.49 3554.06,3537.49 3591,3500.55 U2.62@3591,3158.79 ; v1(1940.32,3769.18) R138.1@1940.32,3806.65
  Bottom Layer w8: v1(1940.32,3554.11) v1(1940.32,3769.18)
RXD/RS485-3: R139.1 U2.25 | length 2526.1
  Top Layer w8: v1(2704.32,3769.18) R139.1@2704.32,3806.65 ; v1(3688.58,2760.4) 3709.11,2739.86 U2.25@3709.11,2706.04
  Bottom Layer w8: v1(2704.32,3769.18) 2680.58,3792.92 2575.3,3792.92 2557.91,3775.52 2557.91,2708.79 2610.42,2656.28 3584.47,2656.28 v1(3688.58,2760.4)
RXD_0: R84.1 R210.1 | length 2767.5
  Top Layer w8: R84.1@5176.54,748 5204.3,748 5236.69,780.39 5236.69,997.58 5159.77,1074.49 5159.77,2030.71 5220.59,2091.53 6399.82,2091.53 6434.04,2057.31 R210.1@6434.04,1959.18
RXD_1: R85.1 R211.1 | length 2801
  Top Layer w8: R85.1@5176.54,798 5204.46,798 5217.09,810.63 5217.09,989.81 5141.25,1065.66 5141.25,2038.39 5212.92,2110.05 6444.95,2110.05 6473.41,2081.59 R211.1@6473.41,1959.18
RXD_CP2102: R174.1 U1.25 | length 1234.3
  Top Layer w9: U1.25@3491.49,545.86 3491.49,643.38 3526.23,678.12 3657.67,678.12 v1(3677.49,658.3) ; v1(3876,659) 3876,305.87 3896.87,285 4128.06,285 4152,308.94 R174.1@4152,390.64
  Bottom Layer w9: v1(3677.49,658.3) 3677.84,658.65 3875.65,658.65 v1(3876,659)
SCL: R162.1 U18.43 U19.6 | length 400.6
  Top Layer w8: U18.43@5830.5,2987.81 5921.43,2987.81 5970.74,2938.5 5974.3,2938.5 R162.1@5979.3,2933.5 6022.13,2933.5 6071.36,2982.73 6135.86,2982.73 6145.8,2972.79 U19.6@6145.8,2934.53
SCL_MDC: R88.1 U12.6 U20.36 | length 3822.9
  Top Layer w8: v1(4212,318.17) R88.1@4212,348 ; U12.6@5941.04,1779.3 v1(5941.04,1851.5) 5941.54,1850.99 6294.92,1850.99 6296.23,1849.68 U20.36@6296.23,1841
  Bottom Layer w8: v1(4212,318.17) 4208.83,318.17 4177.33,349.67 4177.33,578.97 4080.82,675.47 4080.82,1031.1 4139.36,1089.64 5000.35,1089.64 5050.13,1139.42 5050.13,1800.19 5101.44,1851.5 v1(5941.04,1851.5)
SDA: R161.1 U18.42 U19.5 | length 326.5
  Top Layer w8: U18.42@5830.5,2968.13 5831.32,2968.95 5906.75,2968.95 5969.73,2905.97 5974.3,2905.97 R161.1@5979.3,2900.97 ; R161.1@5975.8,2900.97 6022.32,2900.97 6070.12,2948.76 6087.6,2948.76 6095.8,2940.56 U19.5@6095.8,2934.53
SDA_MDIO: R87.1 U12.5 U20.37 | length 3348
  Top Layer w8: v1(4152,698) R87.1@4212,698 ; U12.5@5991.04,1779.3 v1(5991.04,1826.5) 6222.69,1826.5 6237.18,1812 U20.37@6237.18,1781.96
  Bottom Layer w8: v1(4152,698) 4096.35,753.65 4096.35,1015.26 4148.76,1067.68 5011.97,1067.68 5071.13,1126.84 5071.13,1788.49 5109.14,1826.5 v1(5991.04,1826.5)
SMRXD30: R210.2 SW10.8 U20.29 | length 3083.7
  Top Layer w8: v1(6422.4,2593.81) 6861,3032.41 6861,4385.69 6633,4613.69 SW10.8@6633,4619.6 ; U20.29@6434.04,1841 v1(6434.04,1898) R210.2@6434.04,1922.18
  Bottom Layer w8: v1(6422.4,2593.81) 6422.4,1910.5 6434.04,1898.86 v1(6434.04,1898)
SMRXD31: R211.2 SW10.9 U20.28 | length 3065.4
  Top Layer w8: U20.28@6453.71,1841 6453.71,1878.3 v1(6473.41,1898) R211.2@6473.41,1922.18 ; v1(6472.72,2596.58) 6883,3006.86 6883,4463.89 6733,4613.89 SW10.9@6733,4619.8
  Bottom Layer w8: v1(6472.72,2596.58) 6446.33,2570.19 6446.33,1925.07 v1(6473.41,1898)
SMRXD32: SW10.10 U20.27 | length 3118.6
  Top Layer w8: v1(6471.56,2546.49) 6907,2981.93 6907,4539.69 6833,4613.69 SW10.10@6833,4619.6 ; v1(6473.41,1787.52) U20.27@6473.41,1841
  Bottom Layer w8: v1(6471.56,2546.49) 6471.56,1937.1 6499,1909.67 6499,1813.11 v1(6473.41,1787.52)
SMRXD33: R212.1 SW10.11 | length 2854.8
  Top Layer w8: v1(6512.55,1986.43) 6512.55,1959.41 R212.1@6512.78,1959.18 ; v1(6517.74,2545.11) 6933,2960.37 SW10.11@6933,4619.6
  Bottom Layer w8: v1(6512.55,1986.43) 6512.55,2461.5 6488.21,2485.84 6488.21,2515.59 v1(6517.74,2545.11)
SMRXDV3: R207.1 SW10.12 U20.25 | length 3176.1
  Top Layer w8: U20.25@6512.78,1841 6541.37,1841 6553.04,1852.67 R207.1@6553.04,1922.18 6553.13,1922.09 6592.91,1922.09 v1(6593,1922) ; v1(6516.36,2496.18) 6959,2938.82 6959,4539.69 7033,4613.69 SW10.12@7033,4619.6
  Bottom Layer w8: v1(6516.36,2496.18) 6545.26,2525.08 6579.9,2525.08 6593,2511.98 v1(6593,1922)
SMTXD32: SW10.13 U20.18 | length 3363
  Top Layer w8: v1(6441,1740) 6441,1713.22 6490.38,1663.84 U20.18@6571.82,1663.84 ; v1(6567.36,2496.18) 6983,2911.82 6983,4463.69 7133,4613.69 SW10.13@7133,4619.6
  Bottom Layer w8: v1(6441,1740) 6472.92,1740 6536.36,1803.44 6536.36,2465.18 v1(6567.36,2496.18)
SMTXD33: SW10.14 U20.17 | length 3454.7
  Top Layer w8: v1(6420,1697) 6472.85,1644.15 U20.17@6571.83,1644.15 ; v1(6560.81,2446.91) 7005,2891.09 7005,4385.69 7233,4613.69 SW10.14@7233,4619.6
  Bottom Layer w8: v1(6420,1697) 6456.97,1697 6560.81,1800.84 v1(6560.81,2446.91)
SPI2_CS: R66.1 U2.32 | length 3792
  Top Layer w8: R66.1@1835.47,1579.8 1705.27,1579.8 1544.36,1740.71 1544.36,2298.14 1621.73,2375.5 2199.05,2375.5 2390.44,2184.11 3746.39,2184.11 3847.07,2284.8 U2.32@3847.07,2705.89
SPI2_MISO: R71.1 U2.29 | length 3879.4
  Top Layer w8: R71.1@1835.47,1776.65 1700.89,1776.65 1655.44,1822.1 1655.44,2258.27 1684.52,2287.35 2150.58,2287.35 2370.61,2067.32 3806.08,2067.32 3946.38,2207.62 3946.38,2664.37 3962,2680 v1(3962,2682.42)
  Top Layer w9: v1(3768.17,2622.11) 3787.85,2641.79 U2.29@3787.85,2706.04
  Bottom Layer w9: v1(3768.17,2622.11) 3901.69,2622.11 v1(3962,2682.42)
SPI2_MOSI: R70.1 U2.21 | length 4181.7
  Top Layer w8: R70.1@1835.47,1737.28 1701.08,1737.28 1633.57,1804.79 1633.57,2264.96 1674.37,2305.75 2159.76,2305.75 2377.17,2088.35 3792.98,2088.35 3928.01,2223.38 3928.01,2695.68 v1(3962,2729.67) ; U2.21@3630.37,2706.04 3630.37,2789.19 3642.83,2801.64 3827.6,2801.64 3841.01,2788.22 v1(3841.01,2760.4)
  Bottom Layer w8: v1(3841.01,2760.4) 3841.01,2717.97 3857.2,2701.78 3934.12,2701.78 v1(3962,2729.67)
SPI2_SCK: R68.1 U2.33 | length 3814.9
  Top Layer w8: R68.1@1835.47,1658.54 1704.04,1658.54 1589.55,1773.02 1589.55,2281.16 1650.04,2341.65 2177.79,2341.65 2383.51,2135.94 3768.31,2135.94 3888.37,2256 3888.37,2765.21 3906.03,2782.87 3923.74,2782.87 U2.33@3925.65,2784.78
SPI3_CS: U2.47 U18.50 | length 4266.4
  Top Layer w8: U2.47@3925.65,3060.37 3884.75,3060.37 3878,3067.11 3878,3086.98 3920.89,3129.87 3920.89,3384.04 3987.5,3450.64 4477.09,3450.64 4518.07,3409.66 4518.07,2647.24 4613.83,2551.48 5904.56,2551.48 5956.05,2602.97 5956.05,2716.7 v1(5970.74,2731.39) ; U18.50@5785.23,3111.83 5785.23,3132.93 5798.96,3146.66 v1(5828.28,3146.66)
  Bottom Layer w8: v1(5828.28,3146.66) 5828.28,3205.72 5859.89,3237.33 5991.87,3237.33 6020,3209.2 6020,2780.65 v1(5970.74,2731.39)
SPI3_MISO: U2.1 U18.13 | length 3345.3
  Top Layer w8: U2.1@3472.9,3080.06 v1(3472.9,3118.26) ; v1(4636,3512.11) 4635.58,3511.69 4635.58,2767.8 4684.37,2719 4803.68,2719 4853.85,2668.83 5379.44,2668.83 5406.01,2695.4 5406.01,2822.27 5433.75,2850.02 U18.13@5484.05,2850.02
  Bottom Layer w8: v1(3472.9,3118.26) 3472.9,3455.57 3529.44,3512.11 v1(4636,3512.11)
SPI3_MOSI: U2.2 U18.17 | length 3262.2
  Top Layer w8: U2.2@3472.9,3060.37 3508.12,3060.37 3522.83,3075.08 v1(3522.83,3267.11) ; v1(4547.3,3481.77) 4577.12,3451.95 4577.12,2721.04 4651.66,2646.49 5410.36,2646.49 5509.64,2745.77 U18.17@5509.64,2765.37
  Bottom Layer w8: v1(3522.83,3267.11) 3522.83,3443.94 3560.66,3481.77 v1(4547.3,3481.77)
SPI3_SCK: U2.64 U18.19 | length 3319.2
  Top Layer w8: U2.64@3551.63,3158.79 3551.63,3085.56 3579.88,3057.32 3797.66,3057.32 3885.98,3145.64 3885.98,3403.86 3971.5,3489.37 4497.74,3489.37 4556.75,3430.37 4556.75,2668.96 4634.74,2590.97 5401.81,2590.97 5549.22,2738.38 U18.19@5549.22,2765.59
SPIQ: R170.1 SW11.1 U20.38 | length 2385.3
  Top Layer w8: R170.1@5176.54,698 5220.69,698 5261,738.31 5261,1018.11 5182.85,1096.26 5182.85,1842.29 5200.56,1860 SW11.1@5299,1860 5369.91,1860 5419.2,1810.71 5732.31,1810.71 5806.48,1736.54 6027.29,1736.54 6082.41,1791.67 6176.37,1791.67 6204.46,1763.58 6235.87,1763.58 U20.38@6237.19,1762.27
SPISN: R90.1 U20.39 | length 2365.8
  Top Layer w8: R90.1@5176.54,648 5240.5,648 5286,693.5 5286,1025 5200.86,1110.14 5200.86,1782.92 5214.52,1796.58 5716.98,1796.58 5795.77,1717.8 6032.92,1717.8 6091.44,1776.32 6170.33,1776.32 6202.74,1743.9 6235.87,1743.9 U20.39@6237.18,1742.59
START: C29.2 J4.1 R6.1 SW3.1 U11.11 | length 4395.5
  Top Layer w8: U11.11@4935.47,1171.74 4960.67,1171.74 4966.96,1165.44 v1(4988,1165.44) R6.1@5018,1165.44
  Top Layer w10: v1(7385.5,2790.68) C29.2@7385.5,2821.11 7385.5,2989.14 7411.22,3014.86 SW3.1@7526.45,3014.86 7641.79,3014.86 7691,2965.64 J4.1@7770.22,2965.64
  Bottom Layer w8: v1(4988,1165.44) 4988,2150 5291.66,2453.66 6111.54,2453.66 6330.43,2672.55 7350.6,2672.55 7385.5,2707.45 v1(7385.5,2790.68)
STOP: C58.2 J6.1 R5.1 SW5.1 U11.10 | length 5348.6
  Top Layer w8: R5.1@4634,1171.74 v1@4663.74,1171.74 ; v1@4664.08,1172.08 U11.10@4714.66,1172.08
  Top Layer w10: v1(7385.5,3620.68) C58.2@7385.5,3651.11 7385.5,3819.61 7411.22,3845.33 SW5.1@7526.45,3845.33 7641.79,3845.33 7691,3796.11 J6.1@7770.22,3796.11
  Bottom Layer w8: v1(4664,1172) 4811.03,1172 4947.79,1308.76 4947.79,2182.79 5270.28,2505.28 6090.16,2505.28 6308.43,2723.55 7181.11,2723.55 7318.41,2860.85 7318.41,3553.6 v1(7385.5,3620.68)
SW_CLK/BOOT0: J10.2 J11.2 U2.46 | length 723.8
  Top Layer w10: U2.46@3925.65,3040.69 4003.46,3040.69 4054.69,3091.92 4141.05,3091.92 4169.27,3120.15 J11.2@4169.27,3248.42 4169.27,3302.42 4184.27,3317.42 4353.53,3317.42 4369.27,3333.16 J10.2@4369.27,3385.42
SW_DIO: J11.3 U2.45 | length 525.2
  Top Layer w10: U2.45@3925.65,3021 4018.09,3021 4065.59,3068.5 4238.55,3068.5 4269.27,3099.22 J11.3@4269.27,3248.42
SYNC0: U2.37 U18.34 | length 2702.8
  Top Layer w8: U2.37@3925.65,2863.52 4060.93,2863.52 4131.39,2793.05 v1(4131.39,2624.87) ; v1(4497.3,2624.87) 4590.03,2532.14 5931.72,2532.14 6003.69,2604.11 6003.69,2775.64 5982.8,2796.53 5862.59,2796.53 5848.47,2810.65 U18.34@5830.5,2810.65
  Bottom Layer w8: v1(4131.39,2624.87) v1(4497.3,2624.87)
SYNC1: U2.24 U18.18 | length 2072.3
  Top Layer w8: v1@3689.23,2622.11 3689.23,2705.84 U2.24@3689.43,2706.04 ; v1(4647.13,2620.93) 5409.31,2620.93 5529.54,2741.16 U18.18@5529.54,2765.59
  Bottom Layer w8: v1(3689.02,2622.11) 3712.83,2598.3 4051.82,2598.3 4140.05,2686.54 4581.52,2686.54 v1(4647.13,2620.93)
TFT_BL: R101.1 U2.55 | length 4122.5
  Top Layer w8: v1@1498,3587.11 3659.23,3587.11 3728.8,3517.54 U2.55@3728.8,3158.79 ; R101.1@1689.07,2165.81 v1(1689.07,2250.11)
  Bottom Layer w8: v1(1489.07,3587.11) 1689.07,3387.11 v1(1689.07,2250.11)
TFT_DC: R67.1 U2.61 | length 4550.7
  Top Layer w8: R67.1@1835.47,1619.17 1704.65,1619.17 1567.39,1756.43 1567.39,2290.5 1635.47,2358.58 2188.67,2358.58 2387.6,2159.64 3758.62,2159.64 3868.1,2269.12 3868.1,2799.3 3845.74,2821.66 3629.93,2821.66 3610.69,2840.9 v1(3610.69,2983.03) ; U2.61@3610.69,3158.79 3611.78,3159.88 3611.78,3188.2 v1(3630.37,3206.8)
  Bottom Layer w8: v1(3610.69,2983.03) 3610.69,3187.12 v1(3630.37,3206.8)
TFT_RD: R69.1 U2.60 | length 4384.7
  Top Layer w8: R69.1@1835.47,1697.91 1702.56,1697.91 1612,1788.47 1612,2274.33 1661.72,2324.04 2168.97,2324.04 2380.2,2112.81 3781.86,2112.81 3907.97,2238.92 3907.97,2711.77 3923.74,2727.54 v1(3923.74,2729.67) ; U2.60@3630.37,3158.79 3630.37,3106.46 3648.78,3088.06 v1(3756.05,3088.06)
  Bottom Layer w8: v1(3756.05,3088.06) 3876.97,3088.06 3923.74,3041.29 v1(3923.74,2729.67)
TFT_RST: J24.27 R92.1 U2.59 | length 3378
  Top Layer w8: R92.1@1951.47,1974.13 1968.43,1974.13 2007.39,2013.09 2037.06,2013.09 J24.27@2037.47,2013.5 2091.86,2013.5 2125.33,2046.96 2243.09,2046.96 3819.19,2046.96 3974,2201.78 v1(3974,2638.11) ; U2.59@3650.06,3158.79 3650.06,3127.16 3663.9,3113.32 v1(3783.69,3113.32)
  Bottom Layer w8: v1(3783.69,3113.32) 3926.25,3113.32 3993.69,3045.88 3993.69,2657.8 v1(3974,2638.11)
TFT_TE: R65.1 U2.22 | length 3979.6
  Top Layer w8: R65.1@1835.47,1540.43 1708.04,1540.43 1523.46,1725.01 1523.46,2304.73 1611.38,2392.66 2209.19,2392.66 2396.74,2205.11 3738.39,2205.11 3817.85,2284.58 v1(3817.85,2525.27) ; U2.22@3650.06,2706.04 3648.36,2704.34 3648.36,2562.26 v1(3685.34,2525.27)
  Bottom Layer w8: v1(3685.34,2525.27) v1(3817.85,2525.27)
TX1_N: R184.2 T1.3 U20.3 | length 894.1
  Top Layer w8: T1.3@5984.08,1116.83 5984.08,1134.74 6027.08,1177.74 6027.08,1210.04 6011.56,1225.55 R184.2@6011.56,1228.05 6011.56,1230.55 6027.08,1246.07 6027.08,1274.97 5997.05,1305 5937.32,1305 5918.11,1324.21 5918.11,1357.6 5939.19,1378.68 6009.2,1378.68 6038.34,1349.54 6097.12,1349.54 6155.03,1407.44 6299.65,1407.44 6338.45,1446.24 6338.45,1471.4 6336.92,1472.93 6336.92,1505.05 U20.3@6335.6,1506.37
TX1_P: R183.2 T1.1 U20.4 | length 895.7
  Top Layer w8: T1.1@6084.08,1116.83 6084.08,1134.74 6041.08,1177.74 6041.08,1210.04 6056.6,1225.55 R183.2@6056.6,1228.05 6056.6,1230.55 6041.08,1246.07 6041.08,1279.35 6002.43,1318 5942.71,1318 5931.11,1329.6 5931.11,1352.21 5944.57,1365.68 6003.82,1365.68 6023.03,1346.46 6032.96,1336.54 6102.51,1336.54 6159.71,1393.73 6305.74,1393.73 6352.45,1440.44 6352.45,1471.4 6353.98,1472.93 6353.98,1505.05 U20.4@6355.3,1506.37
TX2_N: R201.2 T2.3 U20.11 | length 812.5
  Top Layer w8: U20.11@6493.08,1506.37 6494.4,1505.05 6494.4,1461.64 6517.01,1439.03 6590.23,1439.03 6647.39,1381.87 6901.49,1381.87 6982.16,1301.2 6982.16,1248.11 6966.64,1232.59 R201.2@6966.64,1230.09 6966.64,1227.59 6982.16,1212.08 6982.16,1179.78 6939.16,1136.78 T2.3@6939.16,1118.87
TX2_P: R200.2 T2.1 U20.12 | length 811.2
  Top Layer w8: U20.12@6512.78,1506.37 6511.46,1505.05 6511.46,1464.38 6522.81,1453.03 6596.03,1453.03 6653.19,1395.87 6907.29,1395.87 6996.16,1307 6996.16,1248.11 7011.68,1232.59 R200.2@7011.68,1230.09 7011.68,1227.59 6996.16,1212.08 6996.16,1179.78 7039.16,1136.78 T2.1@7039.16,1118.87
TX_EN: R81.1 U20.16 | length 3294.1
  Top Layer w8: R81.1@4212,548 v1(4212,598) ; v1(6459.02,1599.47) 6484.03,1624.47 U20.16@6571.82,1624.47
  Bottom Layer w8: v1(4212,598) 4194.17,615.83 4194.17,966.09 4232.29,1004.22 5052.22,1004.22 5141.06,1093.06 5141.06,1465.57 5215.75,1540.26 6399.81,1540.26 v1(6459.02,1599.47)
TXA_N: C85.2 J34.2 R147.1 U18.52 | length 2854.4
  Top Layer w8: U18.52@5745.86,3111.83 5744.94,3112.75 5744.94,3128.74 5743.01,3130.66 5743.01,3152.31 5829.68,3238.98 5837.89,3247.18 5837.89,3322.26 5847.7,3332.07 v1(5847.7,3334.76) ; v1(5852.19,3462.65) 5852.19,3465.33 5862,3475.14 5862,3614.65 5862,3625.65 ccw(c5854,3625.65) 5854,3633.65 5828.35,3633.65 cw(c5828.35,3655.65) 5828.35,3677.65 5897.69,3677.65 ccw(c5897.69,3685.65) 5897.69,3693.65 5847.52,3693.65 cw(c5847.52,3715.65) 5847.52,3737.65 5854,3737.65 ccw(c5854,3745.65) 5862,3745.65 5862,3775.55 5862,3904.54 5862,3949.59 5870.2,3957.79 5880.42,3968.01 5888.62,3976.21 5947.99,3976.21 5956.19,3968.01 5973.1,3951.1 5973.1,3904.7 5944.31,3875.91 5944.31,3853.8 5959,3839.11 5985,3839.11 6003.33,3857.44 6003.33,3963.22 6024.2,3984.09 6054.84,3984.09 6068.84,3970.09 6090.39,3948.54 6205.33,3948.54 6232.69,3975.89 6232.69,3996.35 6213.58,4015.45 6189.4,4015.45 6168.26,3994.31 6160.06,3986.11 6114.72,3986.11 6089.75,4011.08 6089.75,4050.34 6108.07,4068.66 6116.27,4076.86 6230.75,4076.86 6258.32,4104.43 6258.32,4154.65 6248.82,4164.15 C85.2@6248.82,4167.65 6248.82,4171.15 6258.32,4180.65 6258.32,4202.15 6243.32,4217.15 R147.1@6243.32,4219.65 6243.32,4222.15 6258.32,4237.15 6258.32,4366.68 6244.42,4380.58 6227.51,4380.58 6196.34,4349.41 J34.2@6196.34,4338.19
  Bottom Layer w8: v1(5847.7,3334.76) 5847.7,3337.44 5837.89,3347.25 5837.89,3368.31 5858.42,3388.85 5910.86,3388.85 5919.06,3397.05 5931.98,3409.97 5940.19,3418.18 5940.19,3506.15 5917.92,3528.41 5883.69,3528.41 5862,3506.73 5862,3475.14 5852.19,3465.33 v1(5852.19,3462.65)